# Altium PCB KikiFarm.PcbDoc
Units mm, origin at the board's own origin, x right, y up, seen from the top; angles counter-clockwise.
Board outline 72 x 98 mm, 2 copper layers (Top Layer, Bottom Layer), stack 0.801 mm thick; 91 components, 50 nets, 312 pads, 83 vias.
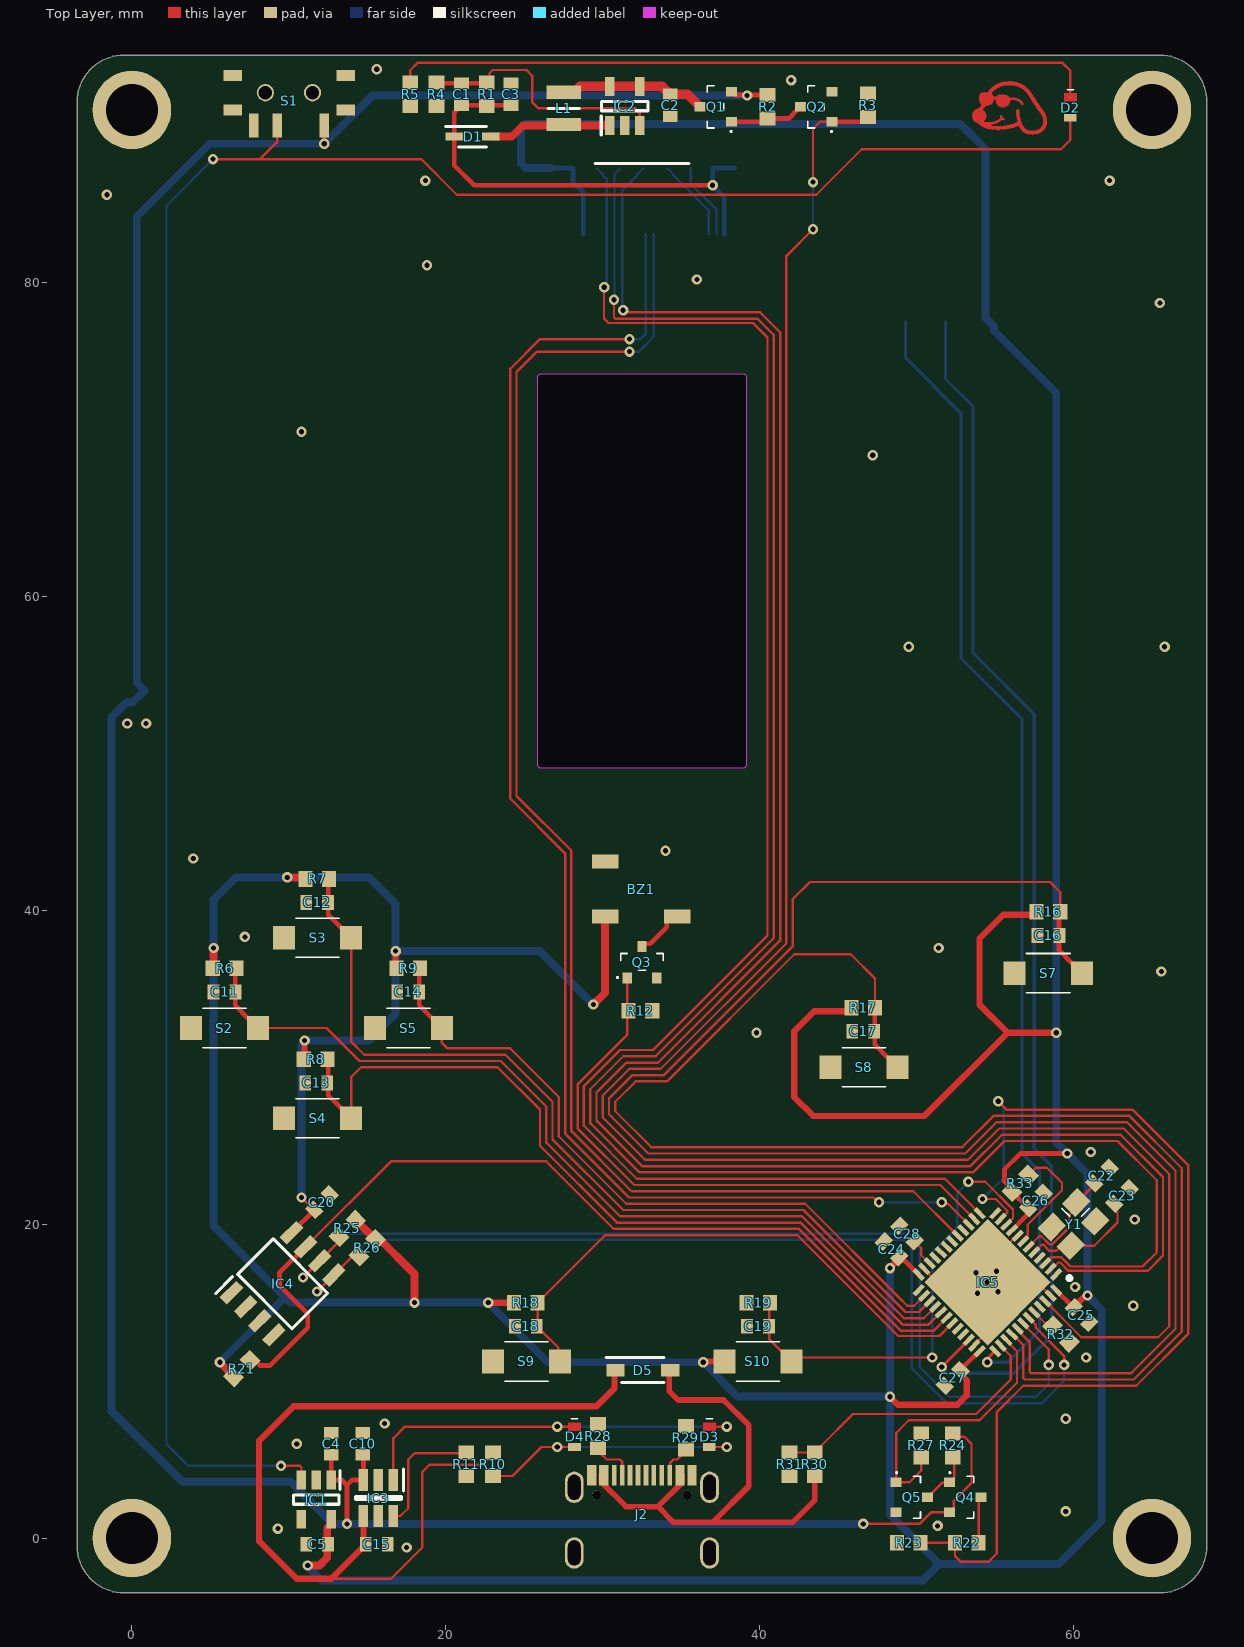
[diagram p0: Top Layer view]
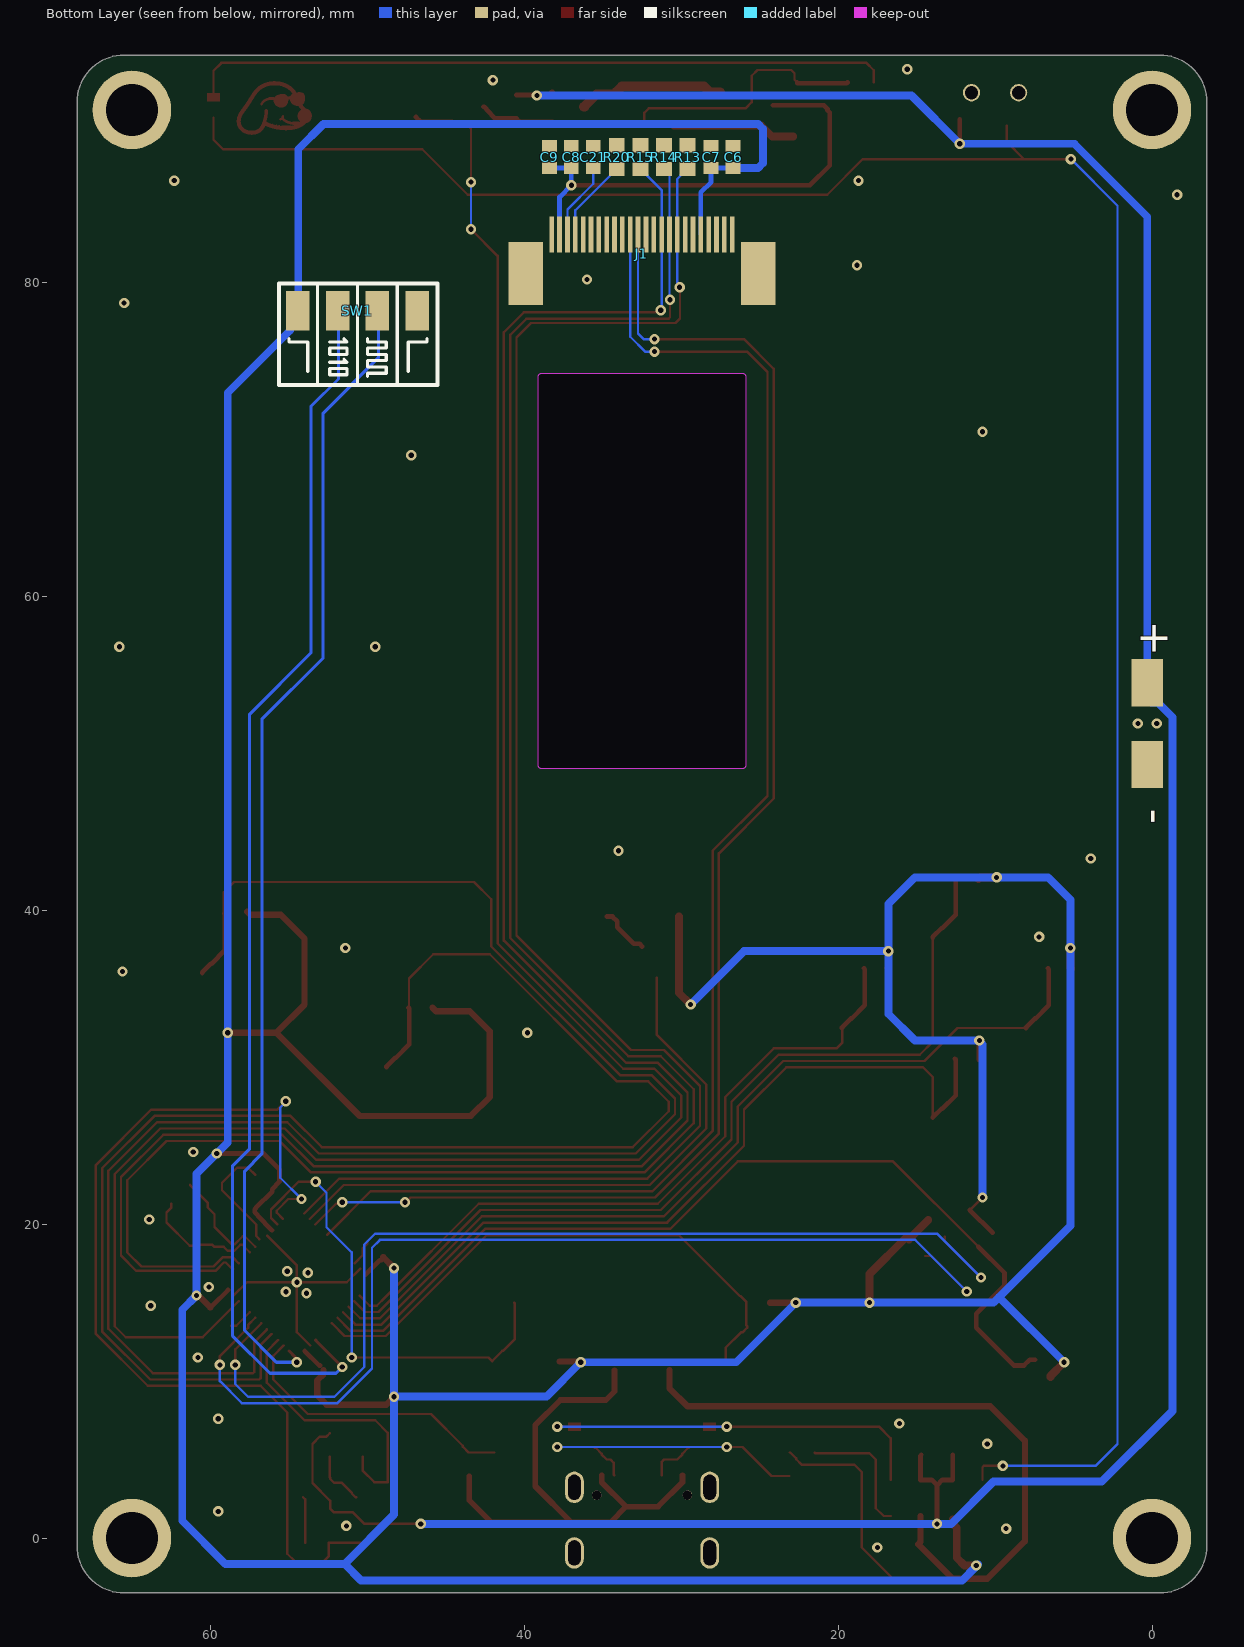
[diagram p1: Bottom Layer view, seen from below]
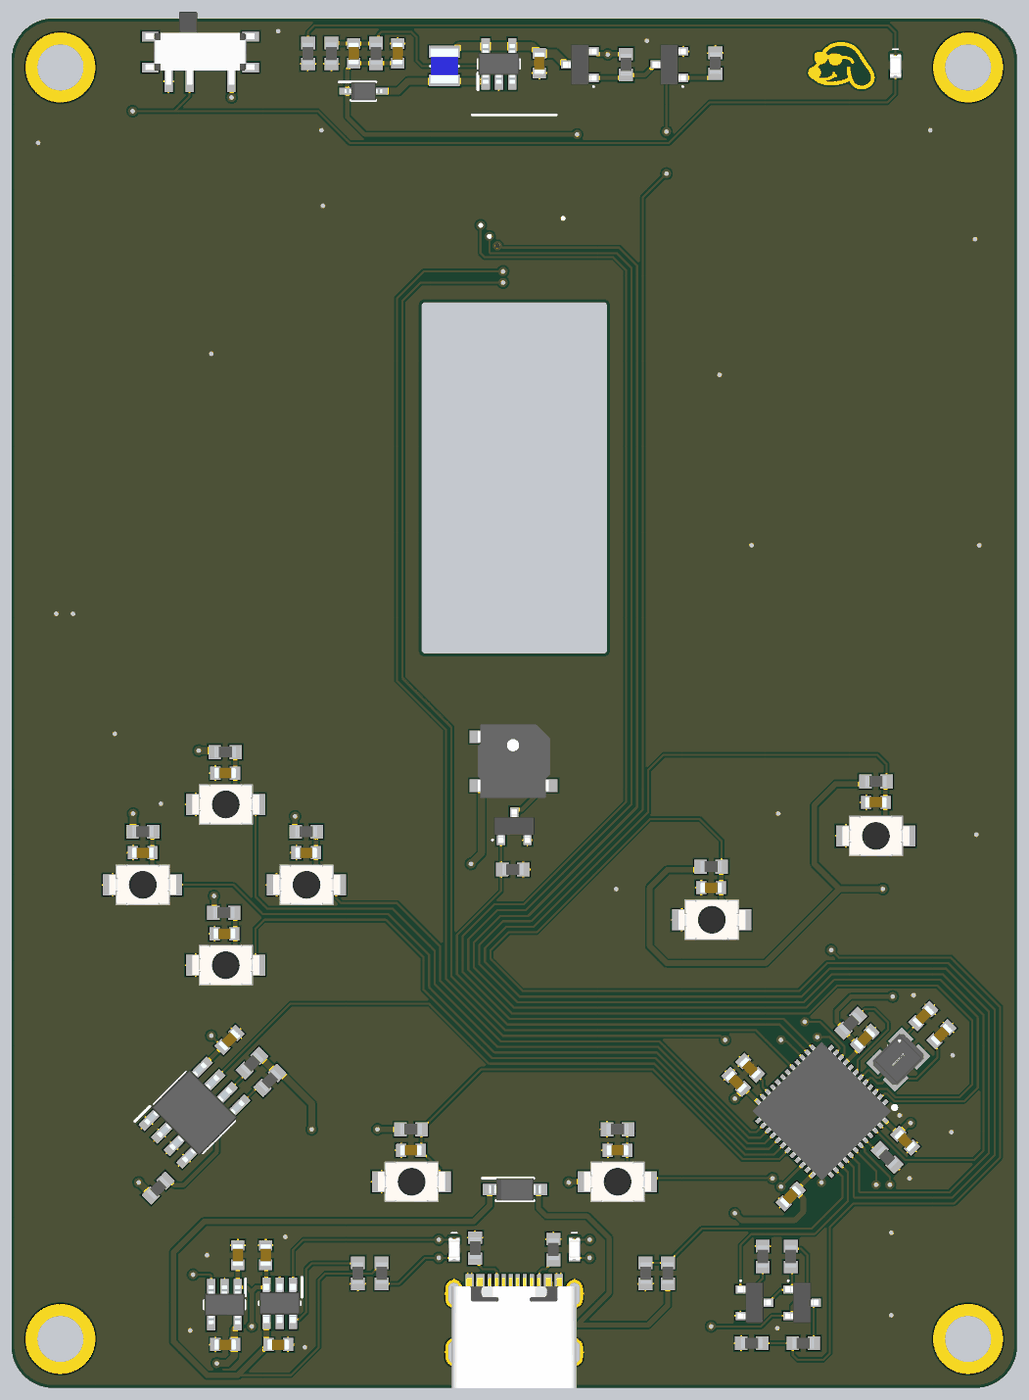
[diagram p2: 3D render of the assembled board from above, using the file's embedded part models]
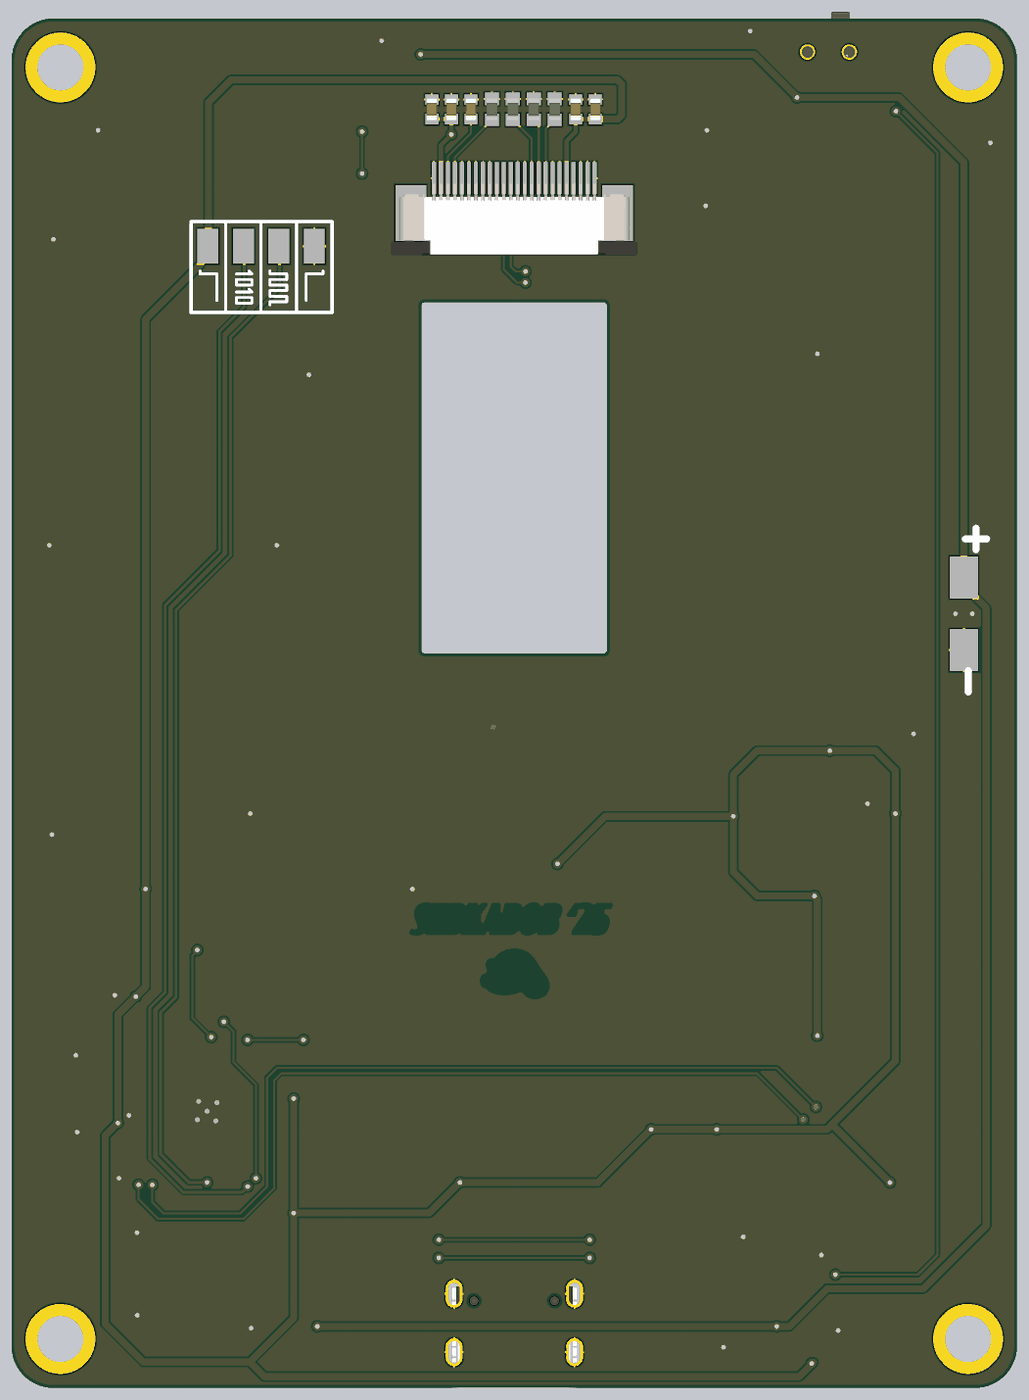
[diagram p3: 3D render of the assembled board from below, using the file's embedded part models]

## Layer stack, top to bottom
Top Solder: solder mask 0.0102, Solder Resist, Dk 3.5
Top Layer: signal copper 0.0356
Dielectric 1: dielectric 0.73, FR-4, Dk 4.8
Bottom Layer: signal copper 0.0356
Bottom Solder: solder mask 0.0102, Solder Resist, Dk 3.5

## Board outline
-3.5,-0.5 -3.5,91.5 cw(c-0.5,91.5) -0.5,94.5 65.5,94.5 cw(c65.5,91.5) 68.5,91.5 68.5,-0.5 cw(c65.5,-0.5) 65.5,-3.5 -0.5,-3.5 cw(c-0.5,-0.5)
cut-out: 25.854,49.304 25.854,73.946 cw(c26.108,73.946) 26.108,74.2 38.9,74.2 cw(c38.9,73.946) 39.154,73.946 39.154,49.304 cw(c38.9,49.304) 38.9,49.05 26.108,49.05 cw(c26.108,49.304)

## Design rules (kind name [scope] priority, off if disabled: settings)
BoardOutlineClearance [All] p1: gap=0.2 ignorepadtopadclearanceinfootprint=FALSE
Clearance [All] p1: gap=0.127 ignorepadtopadclearanceinfootprint=FALSE except(0.25: Arc-Hole Track-Hole SMDPad-Hole THPad-Hole Via-Hole Fill-Hole Poly-Hole Region-Hole Text-Hole)
ComponentClearance [All] p1 off: gap=0.127 collisioncheckmode=3 verticalgap=0.127 showdistances=TRUE
DiffPairsRouting [All] p1: maxlimit=0.127 minlimit=0.127 mostfreqgap=0.127 toplayer_minwidth=0.383 toplayer_maxwidth=0.383 toplayer_prefwidth=0.383 bottomlayer_minwidth=0.383 bottomlayer_maxwidth=0.383 bottomlayer_prefwidth=0.383 impedanceprofiledriven=TRUE impedanceprofileid={FC52F969-8378-40C9-AA1A-739D4F5369FF} impedanceprofilevalue=90.000000 maxuncoupledlength=12.7
Height [All] p1: minheight=0 maxheight=1816.048 prefheight=12.7
HoleSize [All] p1: absolutevalues=TRUE maxlimit=6.3 minlimit=0.3 maxpercent=80.000 minpercent=20.000
HoleToHoleClearance [All] p1: gap=0.25 allowstackedmicrovias=FALSE
MinimumAnnularRing [All] p1: minimumring=0.076
MinimumSolderMaskSliver [All] p1: minsoldermaskwidth=0
PlaneClearance [All] p1: clearance=0.127
PlaneConnect PlaneConnectPowerPads [InPadClass('PowerPads')] p1: planeconnectstyle=Direct reliefexpansion=0.508 reliefentries=4 reliefconductorwidth=0.254 reliefairgap=0.254
PlaneConnect [All] p2: pad.planeconnectstyle=Relief pad.reliefexpansion=0.3 pad.reliefentries=4 pad.reliefconductorwidth=0.127 pad.reliefairgap=0.127 via.planeconnectstyle=Direct via.reliefexpansion=0.3 via.reliefentries=4 via.reliefconductorwidth=0.127 via.reliefairgap=0.127
PolygonConnect PolygonConnectPowerPads [All vs (InPadClass('PowerPads'))] p1: connectstyle=Direct reliefconductorwidth=0.254 reliefentries=4 polygonreliefangle="90 Angle" airgapwidth=0.254
PolygonConnect [All] p2: thpad.connectstyle=Relief thpad.reliefconductorwidth=0.127 thpad.reliefentries=4 thpad.polygonreliefangle="90 Angle" thpad.airgapwidth=0.127 smdpad.connectstyle=Relief smdpad.reliefconductorwidth=0.127 smdpad.reliefentries=4 smdpad.polygonreliefangle="90 Angle" smdpad.airgapwidth=0.127 via.connectstyle=Direct via.reliefconductorwidth=0.127 via.reliefentries=4 via.polygonreliefangle="90 Angle" via.airgapwidth=0.127
RoutingVias [All] p1: holewidth=0.3 width=0.6 viastyle="Through Hole" minholewidth=0.3 minwidth=0.6 maxholewidth=0.6 maxwidth=6.6
SilkToSilkClearance [All] p1: silktosilkclearance=0
SilkToSolderMaskClearance [IsPad] p1: minsilkscreentomaskgap=0.127 clearancetoexposedcopper=TRUE
SolderMaskExpansion [All] p1: expansion=0.075 istentingtop=FALSE
SupplyNets "Schematic Supply Nets_6" [InNet('GND')] p1: voltage=0.000
SupplyNets "Schematic Supply Nets_5" [InNet('+11.5')] p2: voltage=0.000
SupplyNets "Schematic Supply Nets_4" [InNet('VBUS')] p3: voltage=0.000
SupplyNets "Schematic Supply Nets_3" [InNet('+BAT')] p4: voltage=0.000
SupplyNets "Schematic Supply Nets_1" [InNet('VBUS_IN')] p5: voltage=0.000
SupplyNets "Schematic Supply Nets" [InNet('+3.3V')] p6: voltage=0.000
Width [All] p1: maxlimit=25.4 minlimit=0.127 preferedwidth=0.2 minimp=50.000000 maximp=50.000000 favimp=50.000000
20 further rules are at their usual default settings.

## Components (designator, comment, footprint, x,y, rotation, side; value= is the part's Value field where it differs from the comment)
BZ1 "C94598" MLT-5020 30.15,43.1 r0 top locked
C1 "C105620" CAP0603 21,92 r90 top
C2 "C59302" CAP0603 34.3,91.3 r90 top
C3 "C59302" CAP0603 24.15,92 r270 top
C4 "C59302" CAP0603 12.7,6 r270 top
C5 "C59302" CAP0603 11.8,-0.4 r0 top
C6 "C1590" CAP0603 26.7,88 r270 bottom
C7 "C69335" CAP0603 28.1,88 r270 bottom
C8 "C1590" CAP0603 37,88 r270 bottom
C9 "C69335" CAP0603 38.4,88 r270 bottom
C10 "C69335" CAP0603 14.7,6 r270 top
C11 "C1590" CAP0603 5.9,34.8 r180 top
C12 "C1590" CAP0603 11.8,40.5 r180 top
C13 "C1590" CAP0603 11.747,29.001 r180 top
C14 "C1590" CAP0603 17.6,34.8 r180 top
C15 "C69335" CAP0603 15.6,-0.4 r180 top
C16 "C1590" CAP0603 58.4,38.4 r180 top
C17 "C1590" CAP0603 46.6,32.3 r180 top
C18 "C1590" CAP0603 25.1,13.5 r180 top
C19 "C1590" CAP0603 39.9,13.5 r180 top
C20 "C1590" CAP0603 12.1,21.4 r225 top
C21 "C57895" CAP0603 35.6,88 r270 bottom
C22 "C38523" CAP0603 61.8,23.1 r225 top
C23 "C38523" CAP0603 63.1,21.8 r225 top
C24 "C1590" CAP0603 48.4,18.4 r315 top
C25 "C1590" CAP0603 60.5,14.2 r135 top
C26 "C1590" CAP0603 57.6,21.5 r225 top
C27 "C1590" CAP0603 52.3,10.2 r45 top
C28 "C69335" CAP0603 49.4,19.4 r315 top
D1 "C917117" SOD2713X115N 21.7,89.3 r0 top
D2 "C7371905" LED0603 59.8,91.8 r270 top
D3 "C2977076" LED0603 36.8,7.1 r270 top
D4 "C2977076" LED0603 28.2,7.1 r270 top
D5 "C78545" SOD-123 32.55,10.7 r0 top
IC1 "C723789" SOT-23-5 11.75,2.45 r270 top locked
IC2 "C460356" SOT95P282X145-5N 31.4,91.25 r90 top
IC3 "C725791" SOT-23-6 15.7,2.55 r270 top locked
IC4 "C79988" SOIC-8 9.6,16.2 r45 top locked
IC5 "C60420" QFN50P700X700X60-49N-D 54.523,16.298 r225 top locked
J1 "C262643" FPC24P 38.25,82.775 r180 bottom locked
J2 "C165948" TYPE-C-31-M-12 28.182,3.232 r0 top locked
L1 "C237599" DFE2HCAH1R0MJ0L 27.5,91.1 r270 top
Q1 "C4748724" SOT-23-3 37.2,91.2 r90 top
Q2 "C4748714" SOT-23-3 43.6,91.2 r90 top
Q3 "C4748714" SOT-23-3 32.5,36.7 r0 top
Q4 "C4748724" SOT-23-3 53.1,2.6 r270 top locked
Q5 "C4748714" SOT-23-3 49.7,2.6 r270 top locked
R1 "C2933162" RES0603 22.6,92 r270 top
R2 "C14675" RES0603 40.5,91.2 r90 top
R3 "C14675" RES0603 46.9,91.3 r270 top
R4 "C105574" RES0603 19.4,92 r90 top
R5 "C23018" RES0603 17.734,92 r270 top
R6 "C14675" RES0603 5.9,36.3 r0 top
R7 "C14675" RES0603 11.8,42 r0 top
R8 "C14675" RES0603 11.7,30.5 r0 top
R9 "C14675" RES0603 17.6,36.3 r0 top
R10 "C23018" RES0603 23,4.7 r270 top
R11 "C22975" RES0603 21.3,4.7 r90 top
R12 "C14675" RES0603 32.4,33.6 r0 top
R13 "C14675" RES0603 29.6,88 r90 bottom
R14 "C14675" RES0603 31.1,88 r90 bottom
R15 "C14675" RES0603 32.6,88 r90 bottom
R16 "C14675" RES0603 58.4,39.9 r0 top
R17 "C14675" RES0603 46.6,33.8 r0 top
R18 "C14675" RES0603 25.1,15 r0 top
R19 "C14675" RES0603 39.9,15 r0 top
R20 "C2907075" RES0603 34.1,88 r270 bottom
R21 "C14675" RES0603 7,10.8 r225 top
R22 "C23196" RES0603 53.2,-0.3 r180 top
R23 "C14675" RES0603 49.5,-0.3 r180 top
R24 "C14675" RES0603 52.3,5.9 r90 top
R25 "C23186" RES0603 13.73,19.73 r45 top
R26 "C23186" RES0603 15,18.5 r45 top
R27 "C14675" RES0603 50.3,5.9 r90 top
R28 "C23186" RES0603 29.7,6.5 r270 top
R29 "C23186" RES0603 35.3,6.4 r270 top
R30 "C14675" RES0603 43.5,4.7 r270 top
R31 "C14675" RES0603 41.9,4.7 r90 top
R32 "C14675" RES0603 59.2,13 r135 top
R33 "C14675" RES0603 56.6,22.6 r45 top
S1 "C431540" MSK12C02 13.625,91 r180 top locked
S2 "C720477" TS-1088-AR02016 3.75,32.5 r0 top locked
S3 "C720477" TS-1088-AR02016 9.689,38.255 r0 top locked
S4 "C720477" TS-1088-AR02016 9.689,26.75 r0 top locked
S5 "C720477" TS-1088-AR02016 15.475,32.5 r0 top locked
S7 "C720477" TS-1088-AR02016 56.25,36 r0 top locked
S8 "C720477" TS-1088-AR02016 44.5,30 r0 top locked
S9 "C720477" TS-1088-AR02016 23,11.25 r0 top locked
S10 "C720477" TS-1088-AR02016 37.75,11.25 r0 top locked
SW1 "SW Debug" "SW Debug" 46.82,78.1 r0 bottom
Y1 "C9006" X322525MOB4SI 60,20 r225 top locked

## Footprints (in the part's own frame and the unit in brackets; to place one, negate y for a bottom-side part, rotate by r counter-clockwise, add the part's x,y. Pads: shape width x height; smd on the part's side, far side on the other; paste and mask are expansions set on the pad)
CAP0603 [mm]
  rect 0.75x0.94 smd: 1(-0.7,0) 2(0.7,0)
  body extent -0.8,-0.4 0.8,0.4, height 0.9
DFE2HCAH1R0MJ0L [mm]
  rect 0.85x2.2 smd: 1(-1.025,0) 2(1.025,0)
  silkscreen extent 0,-1 0,1, body extent -1.25,-1 1.25,1, height 1.2
FPC24P [mm]
  rect 0.3x2.3 smd: 1(11.5,0.3) 2(11,0.3) 3(10.5,0.3) 4(10,0.3) 5(9.5,0.3) 6(9,0.3) 7(8.5,0.3) 8(8,0.3) 9(7.5,0.3) 10(7,0.3) 11(6.5,0.3) 12(6,0.3) 13(5.5,0.3) 14(5,0.3) 15(4.5,0.3) 16(4,0.3) 17(3.5,0.3) 18(3,0.3) 19(2.5,0.3) 20(2,0.3) 21(1.5,0.3) 22(1,0.3) 23(0.5,0.3) 24(0,0.3)
  rect 2.2x4 smd: ""(-1.651,-2.2) ""(13.151,-2.2)
  body extent -3.05,-5.25 14.55,-0.05, height 2.01
LED0603 [mm]
  round 0.025 smd: 1(0,0)
  rect 0.5x0.8 smd: 2(1.3,0)
  Top Layer region: -0.25,0.4 -0.25,-0.4 0.25,-0.4 0.25,0.4
  silkscreen extent -0.5,-0.2 -0.5,0.2, body extent -0.13,-0.4 1.47,0.4, height 0.59
MLT-5020 [mm]
  rect 1.7x0.9 smd: 1(0,-3.5) 2(4.6,-3.5) ""(0,0)
  body extent -0.28,-4.38 4.92,0.88, height 2.02
MSK12C02 [mm]
  rect 0.6x1.524 smd: 1(1.375,1) 2(4.375,1) 3(5.875,1)
  rect 1.2x0.7 smd: 4(0,0) 4(0,-2.2) 4(7.2,-2.2) 4(7.2,0)
  round 1.1 hole 0.85 unplated: ""(2.125,-1.1) ""(5.125,-1.1)
  body extent -0.28,-3.98 7.52,1.22, height 1.5
QFN50P700X700X60-49N-D [mm]
  rect 0.85x0.3 smd: 1(-3.45,2.75) 2(-3.45,2.25) 3(-3.45,1.75) 4(-3.45,1.25) 5(-3.45,0.75) 6(-3.45,0.25) 7(-3.45,-0.25) 8(-3.45,-0.75) 9(-3.45,-1.25) 10(-3.45,-1.75) 11(-3.45,-2.25) 12(-3.45,-2.75) 25(3.45,-2.75) 26(3.45,-2.25) 27(3.45,-1.75) 28(3.45,-1.25) 29(3.45,-0.75) 30(3.45,-0.25) 31(3.45,0.25) 32(3.45,0.75) 33(3.45,1.25) 34(3.45,1.75) 35(3.45,2.25) 36(3.45,2.75)
  rect 0.3x0.85 smd: 13(-2.75,-3.45) 14(-2.25,-3.45) 15(-1.75,-3.45) 16(-1.25,-3.45) 17(-0.75,-3.45) 18(-0.25,-3.45) 19(0.25,-3.45) 20(0.75,-3.45) 21(1.25,-3.45) 22(1.75,-3.45) 23(2.25,-3.45) 24(2.75,-3.45) 37(2.75,3.45) 38(2.25,3.45) 39(1.75,3.45) 40(1.25,3.45) 41(0.75,3.45) 42(0.25,3.45) 43(-0.25,3.45) 44(-0.75,3.45) 45(-1.25,3.45) 46(-1.75,3.45) 47(-2.25,3.45) 48(-2.75,3.45)
  rect 5.7x5.7 smd paste-1.575: 49(0,0)
  silkscreen extent -4,3.38 -3.75,3.62, body extent -3.55,-3.55 3.55,3.55, height 0.6
RES0603 [mm]
  rect 0.9x1 smd: 1(-0.75,0) 2(0.75,0)
  body extent -0.77,-0.4 0.78,0.4, height 0.45
SOD2713X115N [mm]
  rect 1.125x0.5 smd: 1(-1.162,0) 2(1.162,0)
  silkscreen extent -1.73,-0.65 0.89,0.65, body extent -1.34,-0.65 1.34,0.65, height 1.15
SOD-123 [mm]
  rect 1.15x0.8 smd: 1(-1.75,0) 2(1.75,0)
  silkscreen extent -2.32,-0.8 1.35,0.8, body extent -1.86,-0.8 1.86,0.8, height 1.35
SOIC-8 [mm]
  rect 1.5x0.65 smd: 1(-2.7,1.905) 2(-2.7,0.635) 3(-2.7,-0.635) 4(-2.7,-1.905) 5(2.7,-1.905) 6(2.7,-0.635) 7(2.7,0.635) 8(2.7,1.905)
  silkscreen extent -3.45,-2.45 1.6,2.58, body extent -3,-2.45 3,2.45, height 1.75
SOT95P282X145-5N [mm]
  rect 1.2x0.6 smd: 1(-1.25,0.95) 2(-1.25,0) 3(-1.25,-0.95) 4(1.25,-0.95) 5(1.25,0.95)
  silkscreen extent -1.85,-1.48 0.3,1.5, body extent -1.41,-1.48 1.41,1.48, height 1.45
SOT-23-3 [mm]
  rect 0.6x0.7 smd: 1(-0.95,-1) 2(0.95,-1) 3(0,1)
  silkscreen extent -1.61,-1.03 1.35,0.55, body extent -1.45,-1.2 1.45,1.2, height 0.95
SOT-23-5 [mm]
  rect 1.2x0.6 smd: 1(-1.25,0.95) 2(-1.25,0) 3(-1.25,-0.95) 4(1.25,-0.95) 5(1.25,0.95)
  silkscreen extent -1.85,-1.45 0.3,1.5, body extent -1.4,-1.45 1.4,1.45, height 1.45
SOT-23-6 [mm]
  rect 1.4x0.6 smd: 1(-1.15,0.95) 2(-1.15,0) 3(-1.15,-0.95) 4(1.15,-0.95) 5(1.15,0) 6(1.15,0.95)
  silkscreen extent -1.85,-1.46 0.1,1.6, body extent -1.4,-1.46 1.4,1.46, height 1.25
"SW Debug" [mm]
  rect 1.5x2.5 smd: 1(0,-0.1) 2(2.54,-0.1) 3(5.08,-0.1) 4(7.62,-0.1)
  silkscreen extent -1.28,-1.85 8.82,4.65
TS-1088-AR02016 [mm]
  rect 1.4x1.5 smd: 1(0,0) 2(4.275,0)
  silkscreen extent 0.75,-1.25 3.52,1.25, body extent -0.25,-1.45 4.55,1.45, height 1.96
TYPE-C-31-M-12 [mm]
  oval 1.2x2 hole 0.8 slot 1.6 at 90 deg: 1(0,0) 2(8.627,0) 3(0,-4.18) 4(8.627,-4.18)
  rect 0.3x1.3 smd: A1(0.975,0.768) A4(1.737,0.768) A5(3.052,0.768) A6(4.068,0.768) A7(4.568,0.768) A8(5.576,0.768) A9(6.89,0.768) A12(7.652,0.768) B1(7.354,0.768) B4(6.592,0.768) B5(6.084,0.768) B6(5.068,0.768) B7(3.56,0.768) B8(2.544,0.768) B9(2.036,0.768) B12(1.274,0.768)
  round 0.6 hole 0.6 unplated: ""(1.425,-0.5) ""(7.202,-0.5)
  body extent -0.16,-6.76 8.78,1.14, height 3.11
X322525MOB4SI [mm]
  rect 1.4x1.2 smd paste+0 mask+0: 1(-1.1,-0.85) 2(1.1,-0.85) 3(1.1,0.85) 4(-1.1,0.85)
  body extent -1.9,-1.55 1.9,1.55, height 0.25

## Part data
BZ1: library part MLT-5020, "LCSC Part -  / Piezo Extern. Buzzer -  / C94598"
C1: library part CC0603JRNPO9BN220, "LCSC Part -  / 0603 50V 22pF 5% -  / C105620", Capacitance=22pF
C2 C3 C4 C5: library part 0603B105K250NT, "LCSC Part -  / 0603 25V 1µF 10% X7R-  / C59302", Capacitance=1µF
C6 C8: library part CL10B104KA8NNNC, "LCSC Part -  / 0603 25V 0.1µF 10% X7R -  / C1590", Capacitance=0.1µF
C7 C9 C10 C15 C28: library part CL10A475KA8NQNC, "LCSC Part -  / 0603 25V 4.7µF 10% X5R -  / C69335", Capacitance=4.7µF
C11 C12 C13 C14 C16 C17 C18 C19 C20 C24 C25 C26 C27: library part CL10B104KA8NNNC, "LCSC Part -  / 0603 25V 0.1µF 10% X7R-  / C1590", Capacitance=0.1µF
C21: library part CL10A225KA8NNNC, "LCSC Part -  / 0603 25V 2.2µF 10% X5R -  / C57895", Capacitance=2.2µF
C22 C23: library part CL10C120JB8NNNC, "LCSC Part -  / 0603 50V 12pF ±5% -  / C38523", Capacitance=12pF
D1: library part 1N4148WS, "LCSC Part -  / Diode 300mA 1.25V@150mA -  / C917117"
D2: library part XL-1608PGC-06, "LCSC Part -  / Green LED 5mA -  / C7371905"
D3 D4: library part XL-1608UPC-06, "LCSC Part -  / Pink LED 5mA -  / C2977076"
D5: library part LMBR0540T1G, "LCSC Part -  / Schottky 40V 500mA -  / C78545", Height=1.35mm
IC1: library part HE9073A33M5R, "LCSC Part -  / LDO 500mA 3.3V 100mV -  / C723789"
IC2: library part AP3012KTR-E1, "LCSC Part -  / Boost 500mA 2.6V~16V -  / C460356"
IC3: library part TP4057, "LCSC Part -  / 500mA Battery IC -  / C725791"
IC4: library part M24C64-RMN6TP, "LCSC Part -  / EEPROM 64Kb -  / C79988"
IC5: library part STM32F411CEU6, "LCSC Part -  / STM32F4 -  / C60420", Manufacturer_Name=STMicroelectronics, Mouser Part Number=511-STM32F411CEU6, Arrow Part Number=STM32F411CEU6, Arrow Price/Stock=https://www.arrow.com/en/products/stm32f411ceu6/stmicroelectronics?utm_currency=USD&region=nac, Datasheet Link=http://www.st.com/content/ccc/resource/technical/document/datasheet/b3/a5/46/3b/b4/e5/4c/85/DM00115249.pdf/files/DM00115249.pdf/jcr:content/translations/en.DM00115249.pdf, Height=0.6mm, Manufacturer_Part_Number=STM32F411CEU6, Mouser Price/Stock=https://www.mouser.co.uk/ProductDetail/STMicroelectronics/STM32F411CEU6?qs=pjMTYa9MTGV3ou31YBFa3g%3D%3D
J1: library part AFC07-S24ECA-00, "LCSC Part -  / 24p 0.5mm Pitch FPC - / C262643"
J2: library part TYPE-C-31-M-12, "LCSC Part -  / USB-C 3.1 -  / C165948"
L1: library part 1239AS-H-100M=P2, "LCSC Part -  / 850mA 10µH Inductor +20% -  / C237599", Inductance=10µH
Q1 Q4: library part AO3401-ED, "LCSC Part -  / SOT-23 P-CH 20V 3A -  / C4748724"
Q2 Q3 Q5: library part SI2302-HXY, "LCSC Part -  / SOT-23 N-CH 20V 2.8A -  / C4748714"
R1: library part FRC0603F1804TS, "LCSC Part -  / 0603 1.8M 1% - / C2933162", Resistance=1.8M
R2 R3 R6 R7 R8 R9 R12 R13 R14 R15 R16 R17 R18 R19 R21 R23 R24 R27 R30 R31 R32 R33: library part RC0603FR-07100KL, "LCSC Part -  / 0603 100K 1% - / C14675", Resistance=100K
R4: library part RC0603FR-07200KL, "LCSC Part -  / 0603 200K 1% - / C105574", Resistance=200K
R5 R10: library part 0603WAF3901T5E, "LCSC Part -  / 0603 3.9K 1% - / C22843", Resistance=3.9K
R11: library part 0603WAF2001T5E, "LCSC Part -  / 0603 2K 1% - / C22975", Resistance=2K
R20: library part FRC0603F9103TS, "LCSC Part -  / 0603 910K 1% - / C2907075", Resistance=910K
R22: library part 0603WAF5102T5E, "LCSC Part -  / 0603 51K 1% - / C23196", Resistance=51K
R25 R26 R28 R29: library part 0603WAF5101T5E, "LCSC Part -  / 0603 5.1K 1% - / C23186", Resistance=5.1K
S1: library part MSK12C02, "LCSC Part -  / Slide Switch 50mA -  / C431540"
S2 S3 S4 S5 S7 S8 S9 S10: library part TS-1088-AR02016, "LCSC Part -  / Tactile Switch 3mm x 2mm -  / C720477"
Y1: library part X322525MOB4SI, "LCSC Part -  / 25MHz 12pF Crystal -  / C9006", Frequency=25MHz

## Free pads (board coordinates)
  rect 2x3 smd far side: 3(0.3,49.3) 3(0.3,54.5)
  round 5 hole 3.3: ""(0,0) ""(0,91) ""(65,0) ""(65,91)

## Via types
v1: diameter 0.66, hole 0.33, Top Layer to Bottom Layer, tented both sides, 83 vias

## Nets (pads, with @x,y where several pads share a name; then routed paths per layer and width w, separated by ;. In a path a pad name is that pad's centre, name@x,y a point inside that pad or via, vN(x,y) a via of type N, cw(c..) or ccw(c..) an arc to the next point about the centre after c; other vN are vias at no path point)
+3.3V: BZ1.1 C5.2 C6.2 C7.2 C20.2 C24.2 C25.2 C26.2 C27.2 IC1.5 IC4.8 IC5.9 IC5.24 IC5.36 IC5.48 J1.5 R6.1 R7.1 R8.1 R9.1 R16.1 R17.1 R18.1 R21.2 R25.2 R26.2 R33.1 S10.1 SW1.4 | length 419.7
  Top Layer w0.15: v1(10.8,21.7) 11.595,20.905 C20.2
  Top Layer w0.3: IC4.8 11.605,20.899 C20.2 ; C24.2@49.1,17.7 49.201,17.7 IC5.24@50.106,16.795 ; C27.2@52.995,10.995 53.074,10.995 IC5.36@53.995,11.916 ; IC5.9 56.988,20.531 56.988,20.577 57.172,20.761 57.172,20.938 C26.2 57.105,21.034 R33.1 56.07,22.225 55.6,22.695 55.6,23.5 56.6,24.5 v1(59.6,24.5) ; IC5.48@58.874,15.805 59.884,14.795 C25.2@60.005,14.795
  Top Layer w0.4: R8.1 R8.1@11,30.55 ; R8.1@11,30.5 v1(11,31.7) ; v1(16.8,37.4) 16.8,36.35 R9.1 ; v1(22.7,15) R18.1 ; v1(36.4,11.2) 36.47,11.2 36.52,11.25 S10.1 ; R17.1 45.626,33.576 43.476,33.576 42.2,32.3 42.2,28.1 43.4,26.9 50.5,26.9 55.8,32.2 ; v1(48.3,9) 48.8,8.5 52.6,8.5 53.2,9.1 53.2,10.042 52.795,10.447 C27.2 ; v1(48.3,17.2) 48.3,17.205 48.995,17.9 C24.2@48.995,17.905 ; R16.1 57.467,39.717 55.517,39.717 54,38.2 54,34 55.8,32.2 ; v1(58.9,32.2) 55.8,32.2 ; C25.2 60.711,15.401 60.841,15.401 v1(60.891,15.451)
  Top Layer w0.5: R6.1 5.2,36.35 v1(5.2,37.6) ; v1(5.6,11.2) 6.47,10.33 R21.2 ; v1(9.9,42.1) 10.95,42.1 R7.1 ; v1(11.2,-1.75) 11.95,-1.75 12.447,-1.253 12.447,0.647 12.7,0.9 IC1.5 ; R25.2 R26.2@15.491,19.03 ; R26.2@15.661,19.161 18,16.821 v1(18,15) ; v1(29.4,34) 30.15,34.75 BZ1.1
  Bottom Layer w0.3: C6.2 C7.2 28.1,86.4 28.75,85.75 J1.5
  Bottom Layer w0.5: v1(5.6,11.2) 9.75,15.35 ; v1@10.8,21.743 10.8,31.457 11,31.657 v1(11,31.7) 15.1,31.7 16.8,33.4 v1(16.8,37.4) ; v1@11.07,-1.67 11.076,-1.67 11.157,-1.75 v1(11.2,-1.75) 11.2,-1.793 11.28,-1.874 11.28,-1.88 12.1,-2.7 50.4,-2.7 51.45,-1.65 ; v1@22.657,15 v1(18,15) 10.1,15 9.75,15.35 ; v1(22.7,15) 26.5,11.2 v1(36.4,11.2) 38.589,9.011 48.289,9.011 v1(48.3,9) ; C6.2 25.1,87.3 24.8,87.6 24.8,89.807 25.093,90.1 52.8,90.1 54.4,88.5 54.4,77.74 54.94,77.2 54.94,76.94 58.9,72.98 v1(58.9,32.2) 58.9,25.2 v1@59.569,24.531 ; v1(29.4,34) 26,37.4 v1(16.8,37.4) ; v1(48.3,17.2) v1(48.3,9) ; v1(59.6,24.5) 60.891,23.209 v1(60.891,15.451) 61.8,14.542 61.8,1.1 59.05,-1.65 51.45,-1.65 ; 9.75,15.35 5.2,19.9 v1(5.2,37.6) 5.2,40.676 6.624,42.1 v1(9.9,42.1) 15.1,42.1 16.8,40.4 v1(16.8,37.4) ; v1(48.3,9) 48.3,1.5 51.45,-1.65
+11.5: C1.1 C3.2 C8.2 C9.2 D1.1 J1.23 R1.2 | length 30.2
  Top Layer w0.3: C3.2 C1.1 20.905,91.3 20.68,91.075 20.68,90.98 20.538,90.838 D1.1 20.538,87.462 21.8,86.2 v1(37,86.2)
  Bottom Layer w0.3: J1.23 37.75,85.45 v1(37,86.2) C8.2 C9.2
+BAT: C4.2 C10.2 IC1.1 IC3.3 pad.3@0.3,54.5 Q1.2 Q4.2 R2.2 R24.2 S1.1 | length 194.4
  Top Layer w0.15: v1(46.6,0.9) 50.189,0.9 50.939,1.65 Q4.2 ; Q4.2@52.15,1.65 52.375,1.875 52.375,2.375 53.5,3.5 53.5,6 53.037,6.463 52.612,6.463 R24.2@52.4,6.675
  Top Layer w0.3: v1(12.25,88.85) S1.1 S1.1@12.25,90.4 ; C4.2 IC1.1 13.358,3.7 13.7,3.358 ; v1(13.7,0.9) 13.7,3.358 ; C10.2 14.75,5.25 IC3.3 14.042,3.7 13.7,3.358 ; Q1.2 38.25,92.15 38.45,91.95 R2.2
  Bottom Layer w0.5: v1(39.2,91.926) 15.326,91.926 v1(12.25,88.85) 4.95,88.85 0.3,84.2 0.3,54.5 0.8,54 0.05,53.25 -0.35,53.25 -1.3,52.3 -1.3,8.1 3.2,3.6 10.1,3.6 12.8,0.9 v1(13.7,0.9) v1(46.6,0.9)
A: C16.1 IC5.41 R16.2 S7.2 | length 106.1
  Top Layer w0.15: IC5.41@56.402,13.298 57.2,12.5 57.2,10.588 57.288,10.5 63.666,10.5 66.5,13.334 66.5,23.4 63.4,26.5 55.1,26.5 53.1,24.5 32.9,24.5 30.4,27 30.4,28 31.9,29.5 33.9,29.5 42.1,37.7 42.1,40.704 43.196,41.8 58.5,41.8 59.15,41.15 R16.2
  Top Layer w0.3: R16.2@59.125,39.8 59.075,39.75 59.075,38.4 59.075,37.45 59.925,36.6 59.975,36.6 60.525,36.05 S7.2
B: C17.1 IC5.40 R17.2 S8.2 | length 92.2
  Top Layer w0.15: R17.2 47.35,35.65 45.8,37.2 42.2,37.2 34.1,29.1 32.1,29.1 30.8,27.8 30.8,27.2 33.1,24.9 52.9,24.9 54.9,26.9 63.566,26.9 66.9,23.566 66.9,13.169 63.831,10.1 56.888,10.1 56.8,10.188 56.8,12.3 IC5.40@56.102,12.998
  Top Layer w0.3: R17.2@47.375,33.8 47.325,33.75 47.325,32.3 47.325,31.45 48.175,30.6 48.225,30.6 48.775,30.05 S8.2
BAT_FET: IC5.39 Q5.1 R27.1 | length 18
  Top Layer w0.15: R27.1@50.3,5.175 50.3,4.3 49.55,3.55 Q5.1 48.7,6.7 49.5,7.5 54,7.5 56.4,9.9 56.4,11.9 IC5.39@55.684,12.616
BAT_VOL: IC5.11 R22.2 R23.1 | length 63.4
  Top Layer w0.15: R23.1 R22.2 52.45,-1.15 52.8,-1.5 54.6,-1.5 55.1,-1 55.1,8 56.8,9.7 64,9.7 67.3,13 67.3,23.766 63.766,27.3 55.732,27.3 v1(55.2,27.832) ; v1(54.2,21.6) 55.04,21.6 55.779,20.86 55.779,20.736 IC5.11
  Bottom Layer w0.15: v1(54.2,21.6) 55.557,22.957 55.557,27.432 55.2,27.789 v1(55.2,27.832)
BOOST_POW: IC5.46 Q2.1 R3.2 | length 131.6
  Top Layer w0.15: v1(43.4,83.4) 41.7,81.7 41.7,37.9 33.7,29.9 31.7,29.9 30,28.2 30,26.8 32.7,24.1 53.269,24.1 55.269,26.1 63.2,26.1 66.1,23.2 66.1,13.5 65.4,12.8 60.496,12.8 IC5.46 ; v1(43.4,86.4) 43.4,89.8 43.85,90.25 Q2.1
  Top Layer w0.3: Q2.1 46.6,90.25 R3.2
  Bottom Layer w0.15: v1(43.4,83.4) v1(43.4,86.4)
BOOT: IC5.44 R32.2 | length 1.5
  Top Layer w0.15: IC5.44 58.351,13.53 R32.2
BUZZ: IC5.14 Q3.1 R12.1 | length 38.6
  Top Layer w0.15: Q3.1 31.55,33.5 31.55,32.05 28.4,28.9 28.4,26.106 32.006,22.5 51.5,22.5 IC5.14@53.673,20.327
CHARGE_SENSE: IC5.38 R30.1 R31.2 | length 18.5
  Top Layer w0.15: R31.2 R30.1 43.55,5.45 43.925,5.825 43.925,5.875 45.95,7.9 53.8,7.9 56,10.1 56,11.608 IC5.38@55.338,12.269
CLK: IC5.15 J1.13 | length 94.2
  Top Layer w0.15: v1(31.7,76.4) 26,76.4 24.1,74.5 24.1,47.128 27.6,43.628 27.6,25.775 31.675,21.7 47.257,21.7 47.557,21.4 v1(47.6,21.4) ; v1(51.6,21.4) 51.695,21.305 51.991,21.305 IC5.15
  Bottom Layer w0.15: v1(31.7,76.4) 32.4,76.4 32.75,76.75 J1.13 ; v1(47.6,21.4) v1(51.6,21.4)
CS: IC5.13 J1.8 R13.1 | length 104.7
  Top Layer w0.15: v1(30.1,79.7) 30.079,79.679 30.079,77.718 30.374,77.423 39.577,77.423 40.5,76.5 40.5,38.4 33.2,31.1 31.1,31.1 28.8,28.8 28.8,26.272 32.172,22.9 51.8,22.9 IC5.13@54.023,20.677
  Bottom Layer w0.15: R13.1 29.65,87.25 30.025,86.875 30.025,86.825 30.25,86.6 J1.8 30.25,79.988 30.1,79.838 v1(30.1,79.7)
DC: IC5.2 J1.10 R15.1 | length 128.7
  Top Layer w0.15: v1(31.3,78.232) 31.398,78.135 31.609,78.135 31.643,78.1 40.031,78.1 41.3,76.831 41.3,38.069 33.508,30.277 31.477,30.277 29.6,28.4 29.6,26.603 32.503,23.7 53.434,23.7 55.434,25.7 63,25.7 65.7,23 65.7,18 64.723,17.023 59.685,17.023 59.147,17.561 59.023,17.561 58.609,17.146 IC5.2
  Bottom Layer w0.15: v1(31.3,78.232) 31.25,78.282 J1.10 31.25,85.9 32.175,86.825 32.175,86.875 32.55,87.25 R15.1
DIN: IC5.17 J1.14 | length 93.3
  Top Layer w0.15: v1(31.7,75.6) 25.8,75.6 24.5,74.3 24.5,47.294 28,43.794 28,25.94 31.84,22.1 49.791,22.1 IC5.17@52.572,19.319
  Bottom Layer w0.15: v1(31.7,75.6) 32.3,75.6 33.25,76.55 J1.14
DOWN: C13.1 IC5.29 R8.2 S4.2 | length 53.3
  Top Layer w0.15: S4.2 13.964,26.8 13.964,29.364 14.6,30 23.3,30 26,27.3 26,25 30.9,20.1 42.6,20.1 49.1,13.6 50.764,13.6 IC5.29
  Top Layer w0.3: R8.2@12.564,30.55 12.514,30.5 12.514,28.2 13.364,27.35 13.414,27.35 S4.2@13.964,26.8
GND: C2.1 C3.1 C4.1 C5.1 C6.1 C7.1 C8.1 C9.1 C10.1 C11.2 C12.2 C13.2 C14.2 C15.1 C16.2 C17.2 C18.2 C19.2 C20.1 C21.1 C22.1 C23.1 C24.1 C25.1 C26.1 C27.1 C28.1 IC1.2 IC2.2 IC3.2 IC4.1 IC4.2 IC4.3 IC4.4 IC5.8 IC5.23 IC5.35 IC5.47 IC5.49 J1.1 J1.2 J1.3 J1.6 J1.7 J1.11 J1.12 J1.16 J1.17 J1.18 J1.19 J1.20 J1.24 J2.1 J2.2 J2.3 J2.4 J2.A1 J2.A12 J2.B1 J2.B12 pad.3@0.3,49.3 Q2.2 Q3.2 Q5.2 R3.1 R4.1 R5.2 R11.1 R12.2 R13.2 R14.2 R15.2 R19.1 R20.1 R23.2 R27.2 R28.1 R29.1 R31.1 R32.1 S1.3 S2.1 S3.1 S4.1 S5.1 S7.1 S8.1 S9.1 SW1.1 Y1.2 Y1.4 | length 16.9
  Top Layer w0.15: IC5.23@50.459,17.149 51.308,16.3 v1(54.49,16.3) ; IC5.35@53.641,12.269 54.49,13.118 v1(54.49,16.3) ; IC5.8@56.399,19.27 54.49,17.361 v1(54.49,16.3) ; IC5.47@58.52,15.451 57.672,16.3 v1(54.49,16.3)
  other v1: 17.5,-0.6 9.3,0.6 51.337,0.773 59.5,1.7 10.5,6 16.1,7.3 59.5,7.6 60.8,11.5 63.8,14.8 53.88,15.6 55.195,15.689 60.1,16 53.79,16.91 55.1,17 63.9,20.3 61.1,24.6 39.8,32.2 65.6,36.1 51.4,37.6 7.196,38.306 3.9,43.3 34,43.8 -0.3,51.9 0.9,51.9 49.5,56.8 65.8,56.8 47.2,69 10.8,70.5 65.5,78.7 36,80.2 18.8,81.1 -1.6,85.6 18.7,86.5 62.3,86.5 42,92.9 15.6,93.6
LEFT: C11.1 IC5.28 R6.2 S2.2 | length 56.9
  Top Layer w0.15: S2.2 12.4,32.5 14.5,30.4 23.5,30.4 26.4,27.5 26.4,25.2 31.1,20.5 42.7,20.5 49.2,14 50.457,14 IC5.28
  Top Layer w0.3: R6.2@6.625,36.3 6.575,36.25 6.575,34.8 6.575,33.95 7.425,33.1 7.475,33.1 8.025,32.55 S2.2
NetBZ1_2: BZ1.2 Q3.3 | length 3.3
  Top Layer w0.3: Q3.3 32.5,37.718 32.65,37.868 33.018,37.868 34.082,38.932 34.082,39.3 34.382,39.6 BZ1.2
NetC1_2: C1.2 IC2.3 R1.1 R4.2 | length 16.5
  Top Layer w0.15: R1.1 22.779,92.929 22.779,93.337 22.992,93.55 25.133,93.55 25.5,93.183 25.5,91.498 25.897,91.102 32.063,91.102 32.35,90.815 IC2.3
  Top Layer w0.3: R4.2 19.45,92.7 C1.2 22.6,92.7 R1.1
NetC2_2: C2.2 IC2.4 IC2.5 L1.1 Q1.3 | length 9.5
  Top Layer w0.6: L1.1 28.175,92.125 28.55,92.5 IC2.5 33.779,92.5 34.13,92.149 34.13,92.075 34.205,92 35.4,92 36.15,91.25 36.15,91.2 Q1.3
NetC21_2: C21.2 J1.22 | length 4.9
  Bottom Layer w0.15: C21.2 35.6,86.3 37.25,84.65 J1.22
NetC22_2: C22.2 IC5.6 Y1.1 | length 6.9
  Top Layer w0.15: IC5.6 57.812,19.233 57.936,19.233 58.467,18.702 58.634,18.702 59.742,19.81 59.742,20.629 60.177,21.064 Y1.1 60.179,21.379 C22.2@61.305,22.505
NetC23_2: C23.2 IC5.5 Y1.3 | length 7.8
  Top Layer w0.15: IC5.5 57.969,18.683 58.094,18.683 58.477,18.3 58.9,18.3 59.15,18.55 59.753,18.55 Y1.3 59.894,18.692 60.636,18.692 60.707,18.621 61.321,18.621 62.8,20.1 62.8,20.741 62.505,21.036 C23.2@62.505,21.305
NetC28_2: C28.2 IC5.22 | length 1.7
  Top Layer w0.15: C28.2@49.995,18.905 49.995,18.771 50.3,18.466 50.3,18.015 IC5.22@50.813,17.502
NetD1_2: D1.2 IC2.1 L1.2 | length 7.9
  Top Layer w0.5: D1.2 24.2,89.3 24.9,90 IC2.1
NetD2_1: D2.1 R5.1 | length 45
  Top Layer w0.15: R5.1 17.734,93.534 18.2,94 59.3,94 59.8,93.5 D2.1
NetD2_2: D2.2 IC1.3 S1.2 | length 154.1
  Top Layer w0.15: v1(5.168,87.868) 8.168,87.868 ; S1.2 9.25,88.95 8.168,87.868 ; v1(9.5,4.6) 10.712,4.6 10.8,4.512 IC1.3 ; D2.2 59.8,89.1 59.2,88.5 46.5,88.5 43.6,85.6 20.7,85.6 18.432,87.868 8.168,87.868
  Bottom Layer w0.15: v1(5.168,87.868) 2.2,84.9 2.2,6 3.6,4.6 v1(9.5,4.6)
NetD3_1: D3.1 D4.1 IC3.1 | length 26.4
  Top Layer w0.15: IC3.1 16.65,6.35 17.4,7.1 v1(27.1,7.1) D4.1 ; D3.1 v1(37.9,7.1)
  Bottom Layer w0.15: v1(27.1,7.1) v1(37.9,7.1)
NetD3_2: D3.2 D4.2 R10.2 | length 17.8
  Top Layer w0.15: R10.2@23.1,3.95 24.25,3.95 26.1,5.8 v1(27.1,5.8) D4.2 ; D3.2 v1(37.9,5.8)
  Bottom Layer w0.15: v1(27.1,5.8) v1(37.9,5.8)
NetIC3_6: IC3.6 R11.2 | length 8.3
  Top Layer w0.15: IC3.6 17.1,1.4 17.6,1.9 17.6,5 18,5.4 21.45,5.4 R11.2@21.5,5.45
NetIC5_34: IC5.34 SW1.3 | length 78
  Top Layer w0.2: v1(51.6,10.9) 53.288,12.588 IC5.34@53.288,12.623
  Bottom Layer w0.2: v1(51.6,10.9) 52,10.5 56.2,10.5 58.6,12.9 58.6,23.7 57.5,24.8 57.5,52.5 53.6,56.4 53.6,72.1 51.84,73.86 SW1.3@51.84,77.5
NetIC5_37: IC5.37 SW1.2 | length 72.9
  Top Layer w0.2: v1(54.5,11.2) 54.588,11.288 54.588,11.519 IC5.37@54.985,11.916
  Bottom Layer w0.2: SW1.2@49.3,77.5 49.3,75.2 52.822,71.678 52.822,56.078 56.722,52.178 56.722,24.478 57.822,23.378 57.822,13.222 55.8,11.2 v1(54.5,11.2)
NetJ1_21: J1.21 R20.2 | length 5.3
  Bottom Layer w0.15: R20.2 34.15,87.25 34.525,86.875 34.525,86.825 36.75,84.6 J1.21
NetJ2_A5: J2.A5 R28.2 | length 3
  Top Layer w0.15: R28.2@29.5,5.75 29.55,5.75 29.925,5.375 29.925,5.325 30.25,5 31.1,5 31.234,4.866 J2.A5
NetJ2_B5: J2.B5 R29.2 | length 2.4
  Top Layer w0.15: J2.B5 34.294,4.028 34.294,4.787 34.507,5 34.75,5 35.075,5.325 35.075,5.375 35.45,5.75 R29.2@35.5,5.75
NetQ1_1: Q1.1 Q2.3 R2.1 | length 4.8
  Top Layer w0.3: Q1.1 40.3,90.25 R2.1 41.85,90.45 42.4,91 42.4,91.05 42.55,91.2 Q2.3
NetQ4_1: Q4.1 Q5.3 R24.1 | length 3.6
  Top Layer w0.15: Q5.3 50.75,2.6 50.975,2.825 50.975,2.875 51.613,3.513 52.113,3.513 52.375,3.775 52.375,3.838 52.4,3.863 R24.1@52.4,5.175
NetQ4_3: Q4.3 R22.1 | length 3
  Top Layer w0.15: R22.1 53.95,2.45 Q4.3
RESET: IC5.7 R33.2 | length 7.3
  Top Layer w0.15: IC5.7@56.891,19.039 56.891,19.054 57.081,19.244 57.081,19.981 59.261,22.161 59.261,22.639 58.3,23.6 57.6,23.6 R33.2
RIGHT: C14.1 IC5.26 R9.2 S5.2 | length 44.8
  Top Layer w0.15: S5.2 19.75,31.55 20.1,31.2 24.1,31.2 27.2,28.1 27.2,25.6 31.5,21.3 42.9,21.3 48.85,15.35 49.4,14.8 49.843,14.8 IC5.26
  Top Layer w0.3: R9.2 18.3,36.25 C14.1 18.3,33.95 19.15,33.1 19.2,33.1 19.75,32.55 S5.2
RST: IC5.3 J1.9 R14.1 | length 128.3
  Top Layer w0.15: v1(30.718,78.907) 30.718,77.788 30.806,77.7 39.866,77.7 40.9,76.666 40.9,38.234 33.366,30.7 31.3,30.7 29.2,28.6 29.2,26.437 32.337,23.3 53.6,23.3 55.6,25.3 62.8,25.3 65.3,22.8 65.3,18.2 64.4,17.3 59.8,17.3 59.2,17.9 58.6,17.9 IC5.3
  Bottom Layer w0.15: v1(30.718,78.907) 30.75,78.939 J1.9 30.75,86.9 R14.1
SCL: IC4.6 IC5.42 R25.1 | length 66
  Top Layer w0.15: v1(10.9,16.6) 10.9,16.602 13.2,18.902 R25.1 ; IC5.42@56.753,13.684 58.415,12.021 v1(58.415,11.032)
  Bottom Layer w0.15: v1(10.9,16.6) 13.7,19.4 49.5,19.4 50.2,18.7 50.2,10.9 52.1,9 57.6,9 58.415,9.815 v1(58.415,11.032)
SDA: IC4.5 IC5.43 R26.1 | length 66.9
  Top Layer w0.15: v1(11.8,15.707) 11.801,15.707 IC4.5 14.064,17.97 R26.1 ; IC5.43 57.6,13.575 57.6,13.4 59.4,11.6 v1(59.4,11.032)
  Bottom Layer w0.15: v1(11.8,15.707) 15.093,19 40,19 49.2,19 49.7,18.5 49.7,10.8 51.9,8.6 58,8.6 59.4,10 v1(59.4,11.032)
SELECT: C18.1 IC5.31 R18.2 S9.2 | length 35.7
  Top Layer w0.15: S9.2 27.163,11.362 27.163,12.137 26.195,13.105 26.1,13.105 25.8,13.405 C18.1 25.85,13.55 R18.2 25.85,15.05 26.225,15.425 26.275,15.425 30.15,19.3 42.4,19.3 48.83,12.87 51.449,12.87 IC5.31
START: C19.1 IC5.10 R19.2 S10.2 | length 30.3
  Top Layer w0.15: R19.2 40.6,14.95 C19.1 40.6,12.675 41.35,11.925 41.4,11.925 42.025,11.3 S10.2 42.275,11.5 v1(51,11.5) ; v1(53.3,22.7) 54.378,22.7 56.144,20.934 56.144,20.394 IC5.10
  Bottom Layer w0.15: v1(51,11.5) 51,18.2 52.6,19.8 52.6,22 v1(53.3,22.7)
UP: C12.1 IC5.27 R7.2 S3.2 | length 56.8
  Top Layer w0.15: S3.2 13.964,31.636 14.8,30.8 23.8,30.8 26.8,27.8 26.8,25.4 31.3,20.9 42.8,20.9 49.3,14.4 50.15,14.4 IC5.27
  Top Layer w0.3: R7.2@12.564,42.055 12.514,42.005 12.514,39.705 13.364,38.855 13.414,38.855 13.964,38.305 S3.2
VBUS: C15.2 D5.1 IC3.4 R10.1 | length 58.7
  Top Layer w0.15: 12.7,-2.6 16.5,-2.6 18.5,-0.6 18.5,4.2 18.977,4.677 22.327,4.677 22.675,5.025 22.675,5.075 23.05,5.45 R10.1@23.1,5.45
  Top Layer w0.4: IC3.4 14.75,-0.25 C15.2 12.7,-2.6 10.5,-2.6 8.1,-0.2 8.1,6.2 10.3,8.4 29.6,8.4 30.75,9.55 D5.1@30.75,10.7
VBUS_IN: D5.2 J2.A4 J2.A9 J2.B4 J2.B9 R30.2 | length 34.3
  Top Layer w0.356: J2.A4 29.919,3.556 31.476,2 33.516,2 ; D5.2@34.25,10.7 34.25,9.35 34.804,8.796 37.704,8.796 39.3,7.2 39.3,3.3 37,1 ; J2.A9 35.073,3.556 33.516,2 ; R30.2 43.5,2.4 42.1,1 37,1 ; 33.516,2 34.516,1 36.7,1 37,1
WP: IC4.7 IC5.30 R21.1 | length 59.4
  Top Layer w0.15: IC4.7 16.502,24 26.4,24 30.7,19.7 42.5,19.7 49,13.2 51.072,13.2 IC5.30
  Top Layer w0.3: R21.1@7.461,11.361 7.797,11.361 8.158,11 8.8,11 11.2,13.4 11.2,14.3 9.4,16.1 9.4,16.898 IC4.7
pads on no net: BZ1. IC1.4 IC3.5 IC5.1 IC5.4 IC5.12 IC5.16 IC5.18 IC5.19 IC5.20 IC5.21 IC5.25 IC5.32 IC5.33 IC5.45 J1. J1.4 J1.15 J2. J2.A6 J2.A7 J2.A8 J2.B6 J2.B7 J2.B8 S1. S1.4

## Polygon pours and split planes (outlines as drawn)
GND on Bottom Layer "NONET_L02_P003" (solid, remove dead copper, shelved, pour order 3): -5.6,97.7 -5.3,97.4 71,97.4 71,-6 71.1,-6.1 -5.7,-6.1
GND on Top Layer "NONET_L01_P002" (solid, remove dead copper, shelved, pour order 2): -5.6,97.7 -5.3,97.4 71,97.4 71,-6 71.1,-6.1 -5.7,-6.1

## Other copper
Top Layer:
  region net GND: 3813 vertices and 1 holes, not listed, extent 53.557,89.435 58.308,92.816

## Silkscreen, mask and mechanical layers (free items; w line width, h text height)
Top Overlay:
  lines w0.1: 59.25,21 59.75,20.5 ; 60.5,20.5 61,21
  lines w0.2: 29.5,87.6 35.5,87.6
Bottom Overlay:
  text "+" at 1,56.467 h2
  text "-" at -0.8,45.5 h2 r270
Top Solder:
  region: 3813 vertices and 1 holes, not listed, extent 53.557,89.435 58.308,92.816
Mechanical 13:
  circle w0.254: c58.25,36 r5
  circle w0.254: c46.5,30 r5
  lines w0.1: 31.1,45.5 33.9,45.5 ; 32.5,44.2 32.5,46.8
  lines w0.2: 3.75,30.25 9.5,30.25 9.5,24.5 14,24.5 14,30.25 19.75,30.25 19.75,34.75 14,34.75 14,40.5 9.5,40.5 9.5,34.75 3.75,34.75 3.75,30.25
  lines w0.254: -3.5,-0.5 ccw(c-0.5,-0.5) -0.5,-3.5 65.5,-3.5 ccw(c65.5,-0.5) 68.5,-0.5 68.5,91.5 ccw(c65.5,91.5) 65.5,94.5 -0.5,94.5 ccw(c-0.5,91.5) -3.5,91.5 -3.5,-0.5 ; 25.854,49.304 ccw(c26.108,49.304) 26.108,49.05 38.9,49.05 ccw(c38.9,49.304) 39.154,49.304 39.154,73.946 ccw(c38.9,73.946) 38.9,74.2 26.108,74.2 ccw(c26.108,73.946) 25.854,73.946 25.854,49.304